# Altium PCB Nodo_rack_pcb.PcbDoc
Units mm, origin at the board's own origin, x right, y up, seen from the top; angles counter-clockwise.
Board outline 65 x 55 mm, 2 copper layers (Top Layer, Bottom Layer); 4 components, 17 nets, 70 pads, 0 vias.
Unrouted connection lines stored in the file: 1.
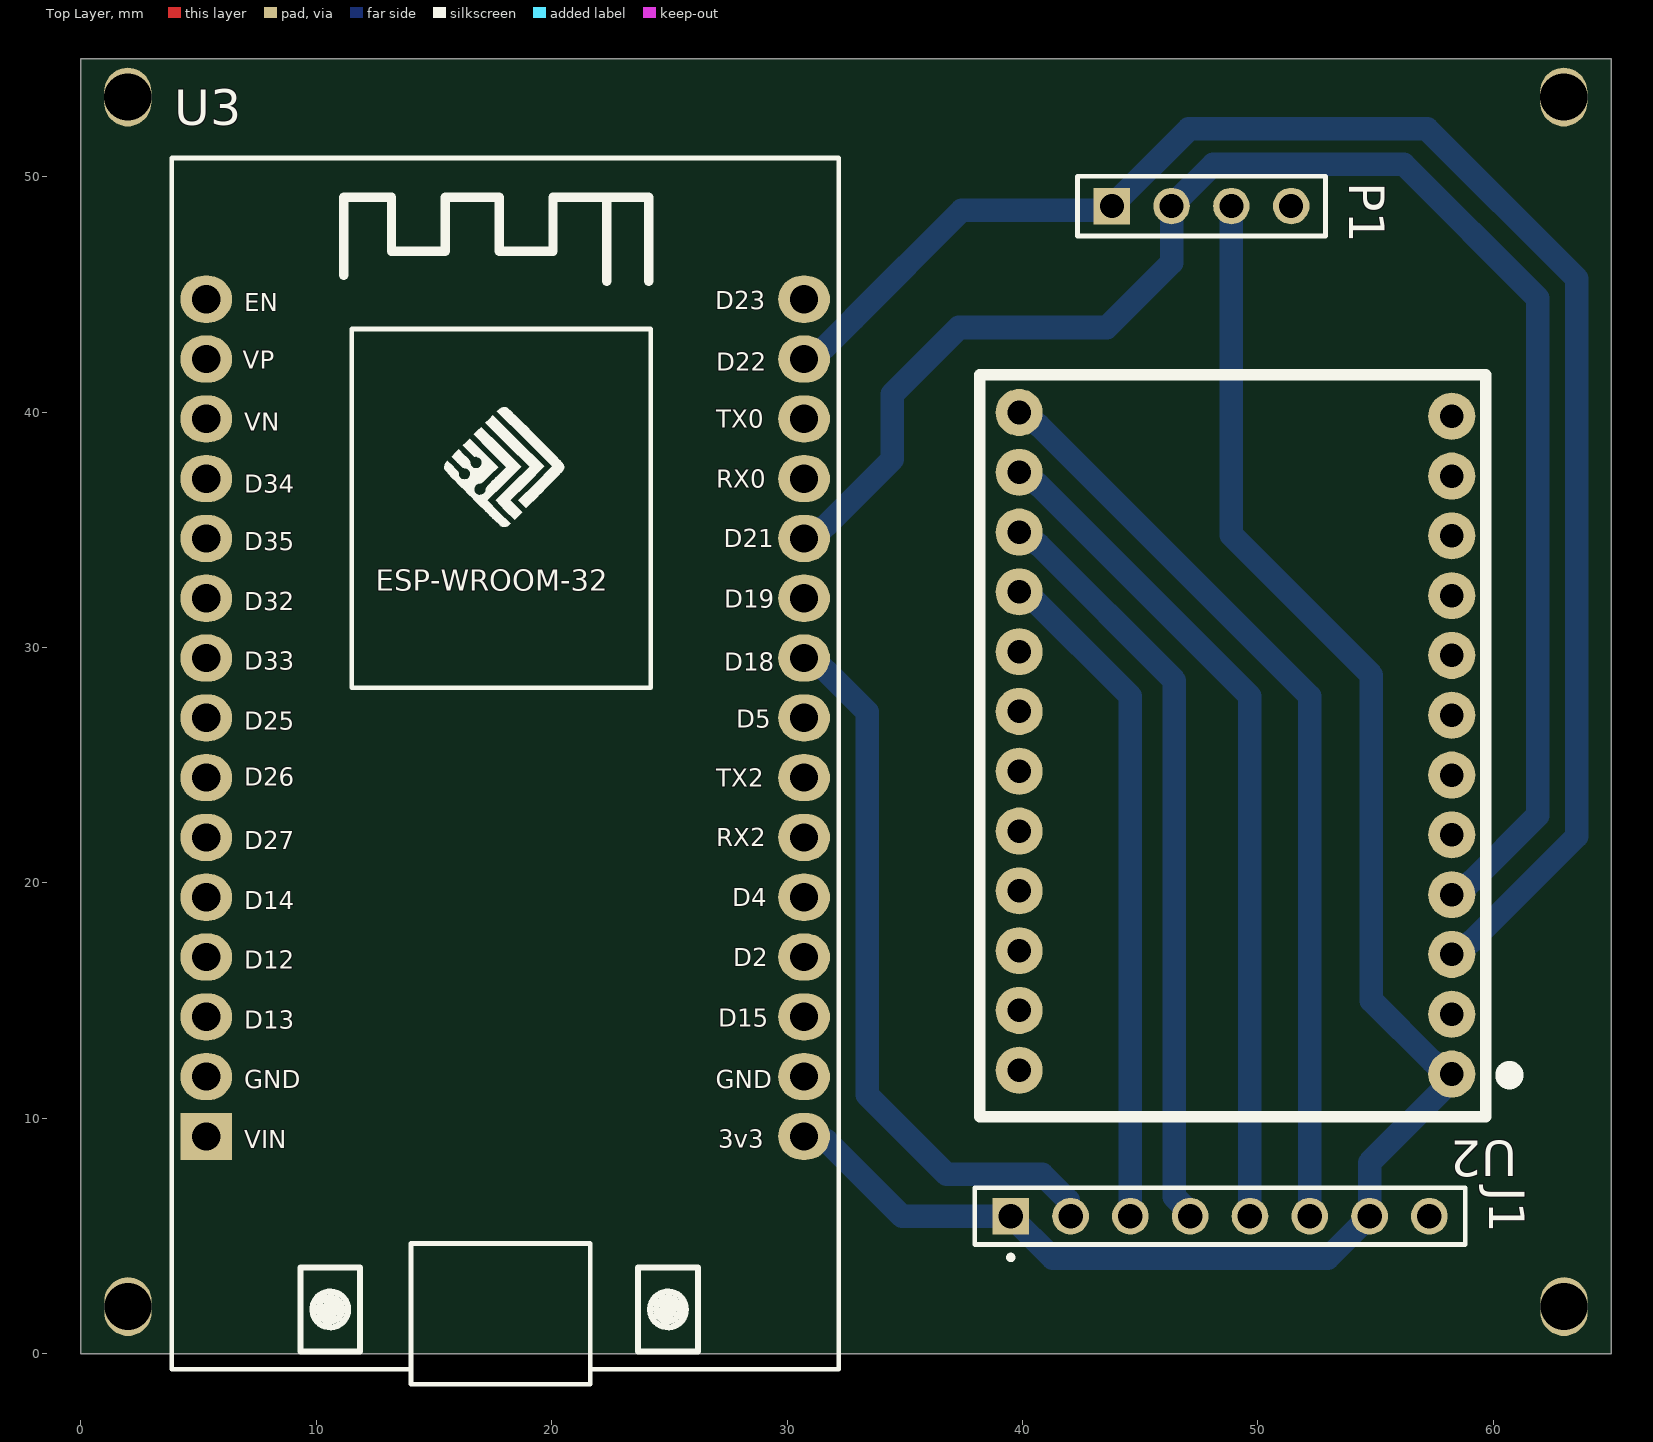
[diagram p0: Top Layer view]
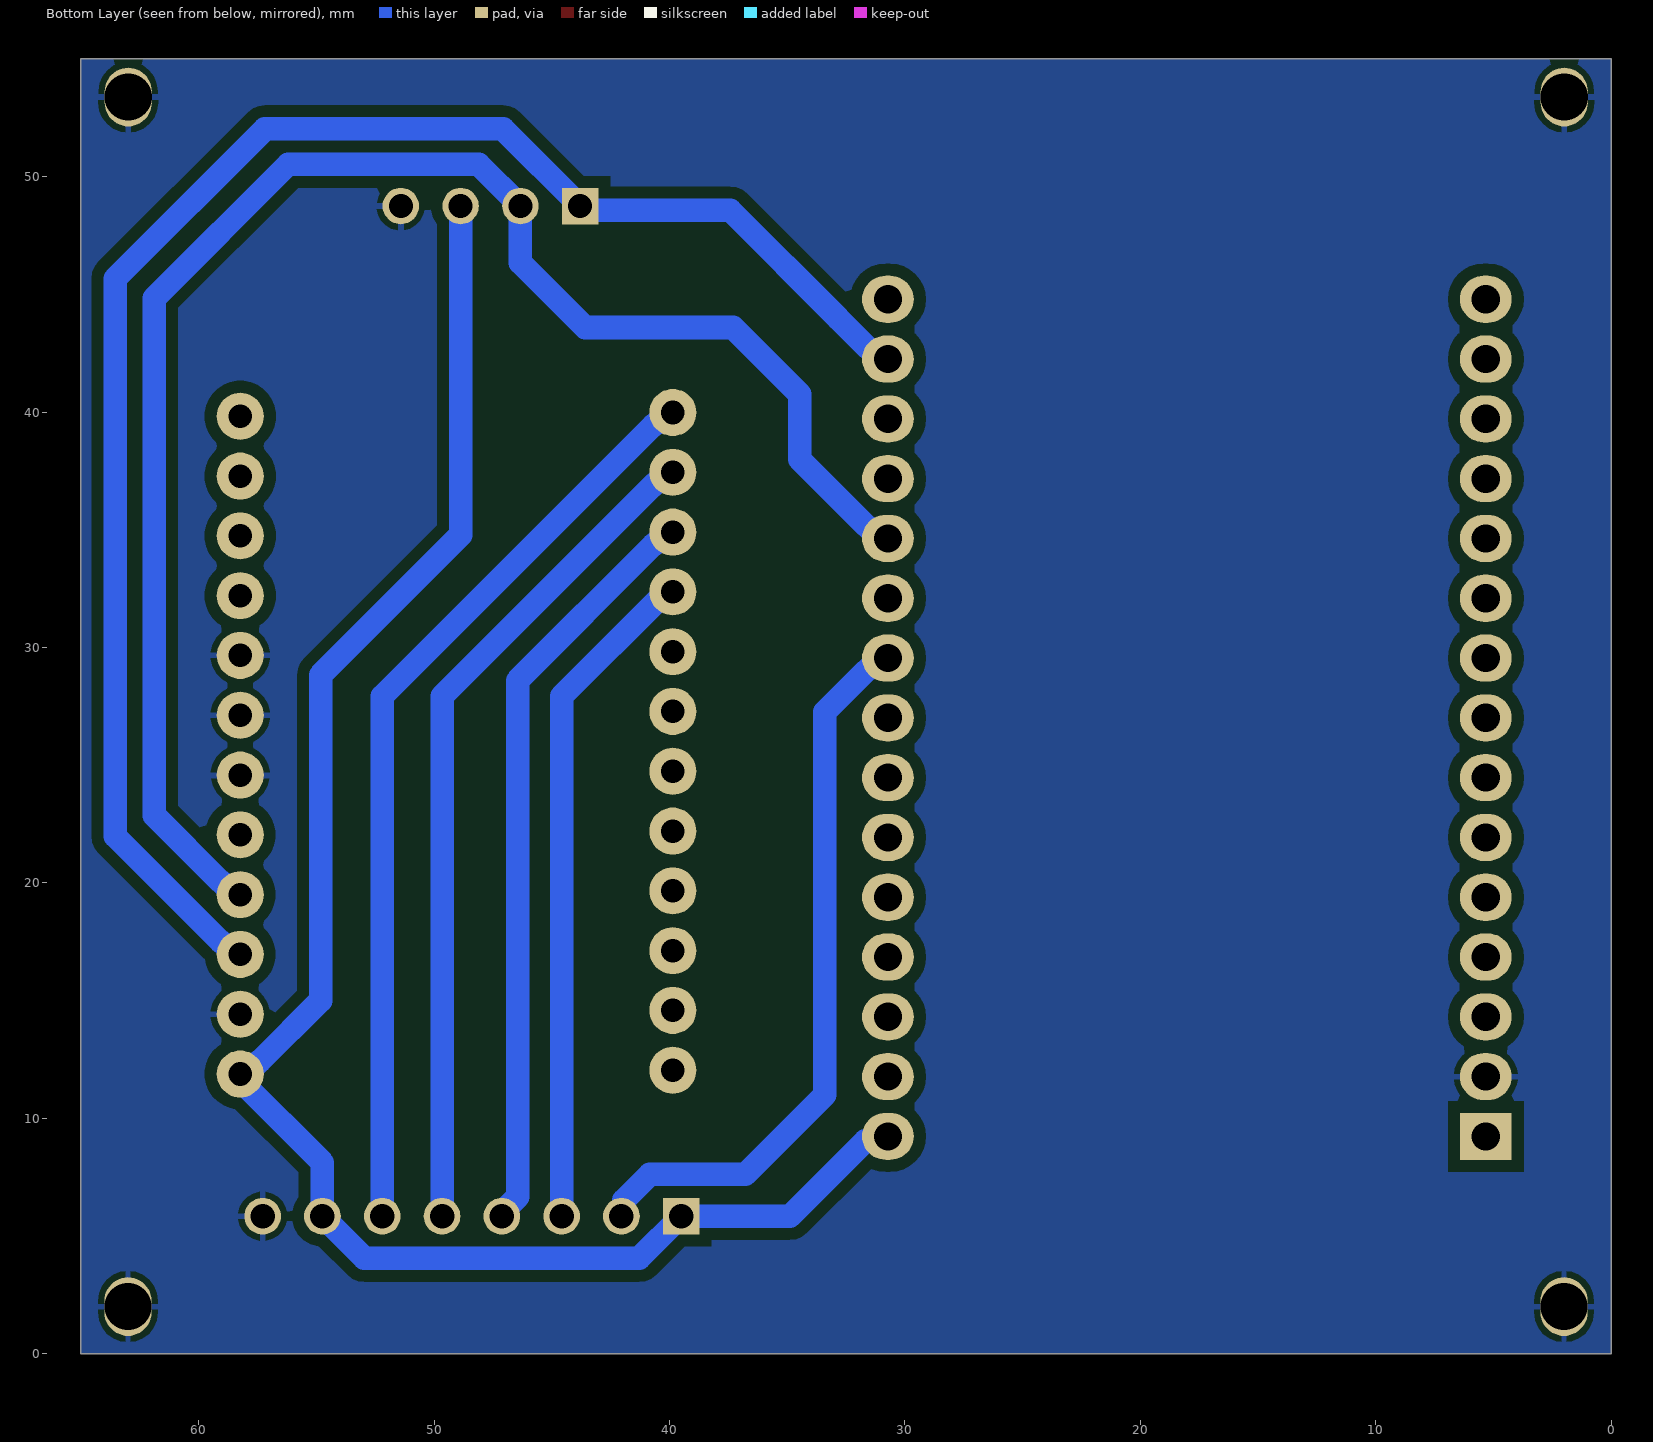
[diagram p1: Bottom Layer view, seen from below]

## Layer stack, top to bottom
Top Solder: solder mask 0.0102, Solder Resist, Dk 3.5
Top Layer: signal copper 0.0356
Dielectric 1: dielectric 0.32, FR-4, Dk 4.8
Bottom Layer: signal copper 0.0356
Bottom Solder: solder mask 0.0102, Solder Resist, Dk 3.5

## Board outline
0,0 65,0 65,55 0,55 0,0

## Design rules (kind name [scope] priority, off if disabled: settings)
Clearance [All] p1: gap=0.5 ignorepadtopadclearanceinfootprint=TRUE
PolygonConnect [All] p1: connectstyle=Relief reliefconductorwidth=0.254 reliefentries=4 polygonreliefangle="90 Angle" airgapwidth=0.254
RoutingVias [All] p1: holewidth=0.711 width=1.27 viastyle="Through Hole" minholewidth=0.711 minwidth=1.27 maxholewidth=0.711 maxwidth=1.27
SolderMaskExpansion [All] p1: expansion=0 istentingtop=FALSE
SupplyNets "Schematic Supply Nets_3" [InNet('+5')] p1: voltage=0.000
SupplyNets "Schematic Supply Nets_2" [InNet('+3V3')] p2: voltage=0.000
SupplyNets "Schematic Supply Nets_1" [InNet('GND')] p3: voltage=0.000
Width [All] p1: maxlimit=1 minlimit=0.254 preferedwidth=1
30 further rules are at their usual default settings.

## Components (designator, comment, footprint, x,y, rotation, side; value= is the part's Value field where it differs from the comment)
J1 "8 pin strip" "8 Pin_2.54mm" 48.263,5.84 r0 top
P1 "TSW-104-08" SMTC-TSW-104-08-X-S 43.79,48.75 r0 top
U2 "PCA9548A" PCA9548A 48.43,24.58 r180 top
U3 "ESP32- 30 pin" "ESP32 - 30 pin" 17.728,23.726 r0 top

## Footprints (in the part's own frame and the unit in brackets; to place one, negate y for a bottom-side part, rotate by r counter-clockwise, add the part's x,y. Pads: shape width x height; smd on the part's side, far side on the other; paste and mask are expansions set on the pad)
"8 Pin_2.54mm" [mm]
  rect 1.56x1.56 / inner round 1.56 / far side rect 1.56x1.56 hole 1.04: 1(-8.763,0)
  round 1.56 hole 1.04: 2(-6.223,0) 3(-3.683,0) 4(-1.143,0) 5(1.397,0) 6(3.937,0) 7(6.477,0) 8(9.017,0)
  silkscreen extent -10.29,-1.85 10.54,1.2
"ESP32 - 30 pin" [mm]
  rect 2.2x2 hole 1.2 paste-2539.97 mask+0.2: 1(-12.408,-14.496)
  oval 2.2x2 hole 1.2 paste-2539.97 mask+0.2: 2(-12.408,-11.956) 3(-12.408,-9.416) 4(-12.408,-6.876) 5(-12.408,-4.336) 6(-12.408,-1.796) 7(-12.408,0.744) 8(-12.408,3.284) 9(-12.408,5.824) 10(-12.408,8.364) 11(-12.408,10.904) 12(-12.408,13.444) 13(-12.408,15.984) 14(-12.408,18.524) 15(-12.408,21.064) 16(12.992,-14.496) 17(12.992,-11.956) 18(12.992,-9.416) 19(12.992,-6.876) 20(12.992,-4.336) 21(12.992,-1.796) 22(12.992,0.744) 23(12.992,3.284) 24(12.992,5.824) 25(12.992,8.364) 26(12.992,10.904) 27(12.992,13.444) 28(12.992,15.984) 29(12.992,18.524) 30(12.992,21.064)
  silkscreen extent -13.87,-25.02 14.46,27.06, body extent -14,-26 14.5,27.7, height 7.95
PCA9548A [mm]
  round 2 hole 1: 1(-9.8,0) 2(-9.8,-2.54) 3(-9.8,2.54) 4(-9.8,-7.62) 5(-9.8,-10.16) 6(-9.8,-12.7) 7(-9.8,-15.24) 8(8.575,-15.4) 9(8.575,-12.86) 10(8.575,-10.32) 11(8.575,-7.78) 12(-9.8,10.16) 13(8.575,-5.24) 14(8.575,-2.7) 15(8.575,-0.16) 16(8.575,2.38) 17(8.575,4.92) 18(8.575,7.46) 19(8.575,10) 20(8.575,12.54) 21(-9.8,-5.08) 22(-9.8,5.08) 23(-9.8,7.62) 24(-9.8,12.7)
  silkscreen extent -12.35,-17 10.25,14.52
SMTC-TSW-104-08-X-S [mm] ".025 SQ Post Terminal Strip Assembly, 1x4 Pins, Vertical, 2.54mm Pitch, Male"
  rect 1.55x1.55 hole 1.02: 1(0,0)
  round 1.55 hole 1.02: 2(2.54,0) 3(5.08,0) 4(7.62,0)
  silkscreen extent -1.46,-1.27 9.08,1.27, body extent -1.27,-1.27 8.89,1.27, height 8.38

## Part data
P1: library part CMP-1024-00358-1, "0.025\" SQ Post Header, Through-hole, Vertical, -55 to 125 degC, 2.54 mm Pitch, 4-Pin, Male, RoHS", Manufacturer=Samtec, PartNumber=TSW-104-08-L-S, Temperature Range="-55 to 125 degC", ComponentLink1Description="Manufacturer URL", ComponentLink1URL=http://www.samtec.com, ComponentLink2Description=Datasheet, ComponentLink2URL=http://www.samtec.com/documents/webfiles/pdf/TSW_TH.PDF, ComponentLink3Description="Package Specification", ComponentLink3URL=http://www.samtec.com/documents/webfiles/cpdf/TSW-XXX-XX-XXX-X-XX-XXX-MKT.pdf, DatasheetVersion=F-214, Mounting Technology=Through-hole, Orientation=Vertical, PackageDescription=".025[0.64] SQ. Post Terminal Strip Assembly", PackageReference=TSW-104-08-X-S, PackageVersion="DM, 8/1988", Pitch="2.54 mm", RoHS=True

## Free pads (board coordinates)
  oval 2x2.5 hole 2 paste+0.256: 1(1.99,53.38) 1(2,2) 1(62.99,53.38) 1(63,2)

## Nets (pads, with @x,y where several pads share a name; then routed paths per layer and width w, separated by ;. In a path a pad name is that pad's centre, name@x,y a point inside that pad or via, vN(x,y) a via of type N, cw(c..) or ccw(c..) an arc to the next point about the centre after c; other vN are vias at no path point)
+3V3: J1.1 J1.7 P1.3 U2.24 U3.16 | length 75.3
  Bottom Layer w1: U3.16 30.911,9.039 31.681,9.039 34.88,5.84 J1.1 41.28,4.06 52.96,4.06 J1.7 ; P1.3 48.87,34.776 54.82,28.826 54.82,15.002 57.402,12.42 57.419,12.42 57.959,11.88 U2.24 58.23,11.609 54.741,8.12 J1.7
+5: 
FLAME_S: J1.2 U3.24 | length 31
  Bottom Layer w1: U3.24 31.091,29.55 31.631,29.01 31.648,29.01 33.4,27.258 33.4,10.99 36.77,7.62 40.83,7.62 41.933,6.517 41.933,5.947 J1.2
GND: J1.8 P1.4 pad.1 U2.1 U2.2 U2.12 U2.21 U3.2
NetJ2_2: 
NetJ2_3: 
NetJ2_4: 
NetJ2_5: 
NetJ2_6: 
RX: 
SC2: J1.5 U2.9 | length 35.8
  Bottom Layer w1: U2.9 40.126,37.44 40.666,36.9 40.683,36.9 49.66,27.923 J1.5
SC3: J1.3 U2.11 | length 28.6
  Bottom Layer w1: U2.11 40.046,32.169 40.335,32.169 44.58,27.923 J1.3
SCL: P1.2 U2.22 U3.26 | length 70.2
  Bottom Layer w1: U3.26 31.091,34.63 31.631,35.17 31.648,35.17 34.474,37.996 34.474,40.764 37.3,43.59 43.58,43.59 46.33,46.34 P1.2 48.105,50.525 56.195,50.525 61.88,44.84 61.88,22.862 59.058,20.04 59.041,20.04 58.501,19.5 U2.22
SD2: J1.6 U2.8 | length 39.4
  Bottom Layer w1: U2.8 40.126,39.98 40.666,39.44 40.683,39.44 52.2,27.923 J1.6
SD3: J1.4 U2.10 | length 32.2
  Bottom Layer w1: U2.10 40.126,34.9 40.666,34.36 40.683,34.36 46.45,28.593 46.45,6.662 47.12,5.992 J1.4
SDA: P1.1 U2.23 U3.29 | length 71
  Bottom Layer w1: U3.29@30.349,42.25 U3.29 31.091,42.25 31.591,42.75 31.608,42.75 32.82,43.962 32.82,43.97 37.42,48.57 43.61,48.57 P1.1 47.065,52.025 57.185,52.025 63.54,45.67 63.54,21.982 59.058,17.5 59.041,17.5 58.501,16.96 U2.23
TX: 
pads on no net: U2.3 U2.4 U2.5 U2.6 U2.7 U2.13 U2.14 U2.15 U2.16 U2.17 U2.18 U2.19 U2.20 U3.1 U3.3 U3.4 U3.5 U3.6 U3.7 U3.8 U3.9 U3.10 U3.11 U3.12 U3.13 U3.14 U3.15 U3.17 U3.18 U3.19 U3.20 U3.21 U3.22 U3.23 U3.25 U3.27 U3.28 U3.30

## Polygon pours and split planes (outlines as drawn)
GND on Bottom Layer "GND_L02_P000" (solid, remove dead copper, pour order 0): 0,55 0,0 65,0 65,55

## Text inside footprints (layer, text, board x,y; h text height)
U3: Top Overlay "VIN" at 6.93,8.729 h0.76; Top Overlay "ESP-WROOM-32" at 12.518,32.409 h0.9; Top Overlay "GND" at 6.93,11.269 h0.76; Top Overlay "D13" at 6.93,13.809 h0.76; Top Overlay "D12" at 6.93,16.349 h0.76; Top Overlay "D14" at 6.93,18.889 h0.76; Top Overlay "D27" at 6.93,21.429 h0.76; Top Overlay "D26" at 6.93,24.119 h0.76; Top Overlay "D25" at 6.93,26.509 h0.76; Top Overlay "D33" at 6.93,29.049 h0.76; Top Overlay "D32" at 6.93,31.589 h0.76; Top Overlay "D35" at 6.93,34.129 h0.76; Top Overlay "D34" at 6.93,36.565 h0.76; Top Overlay "VN" at 6.93,39.209 h0.76; Top Overlay "VP" at 6.883,41.836 h0.76; Top Overlay "EN" at 6.93,44.289 h0.76; Top Overlay "D23" at 26.949,44.376 h0.76; Top Overlay "D22" at 26.996,41.762 h0.76; Top Overlay "TX0" at 26.996,39.326 h0.76; Top Overlay "D21" at 27.309,34.246 h0.76; Top Overlay "D19" at 27.33,31.676 h0.76; Top Overlay "D18" at 27.33,29.009 h0.76; Top Overlay "D5" at 27.838,26.596 h0.76; Top Overlay "TX2" at 26.996,24.086 h0.76; Top Overlay "RX2" at 26.996,21.546 h0.76; Top Overlay "D4" at 27.677,19.006 h0.76; Top Overlay "D2" at 27.71,16.466 h0.76; Top Overlay "D15" at 27.076,13.896 h0.76; Top Overlay "GND" at 26.963,11.282 h0.76; Top Overlay "3v3" at 27.067,8.742 h0.76; Top Overlay "RX0" at 26.996,36.786 h0.76